# Altium PCB PMP41115.PcbDoc (part 3 of 6)
Units mm, origin at the board's own origin, x right, y up, seen from the top; angles counter-clockwise.
Board outline 102.92 x 46.74 mm, 4 copper layers (Top Layer, Signal Layer 1, Signal Layer 2, Bottom Layer), stack 1.016 mm thick; 174 components, 114 nets, 547 pads, 2622 vias.
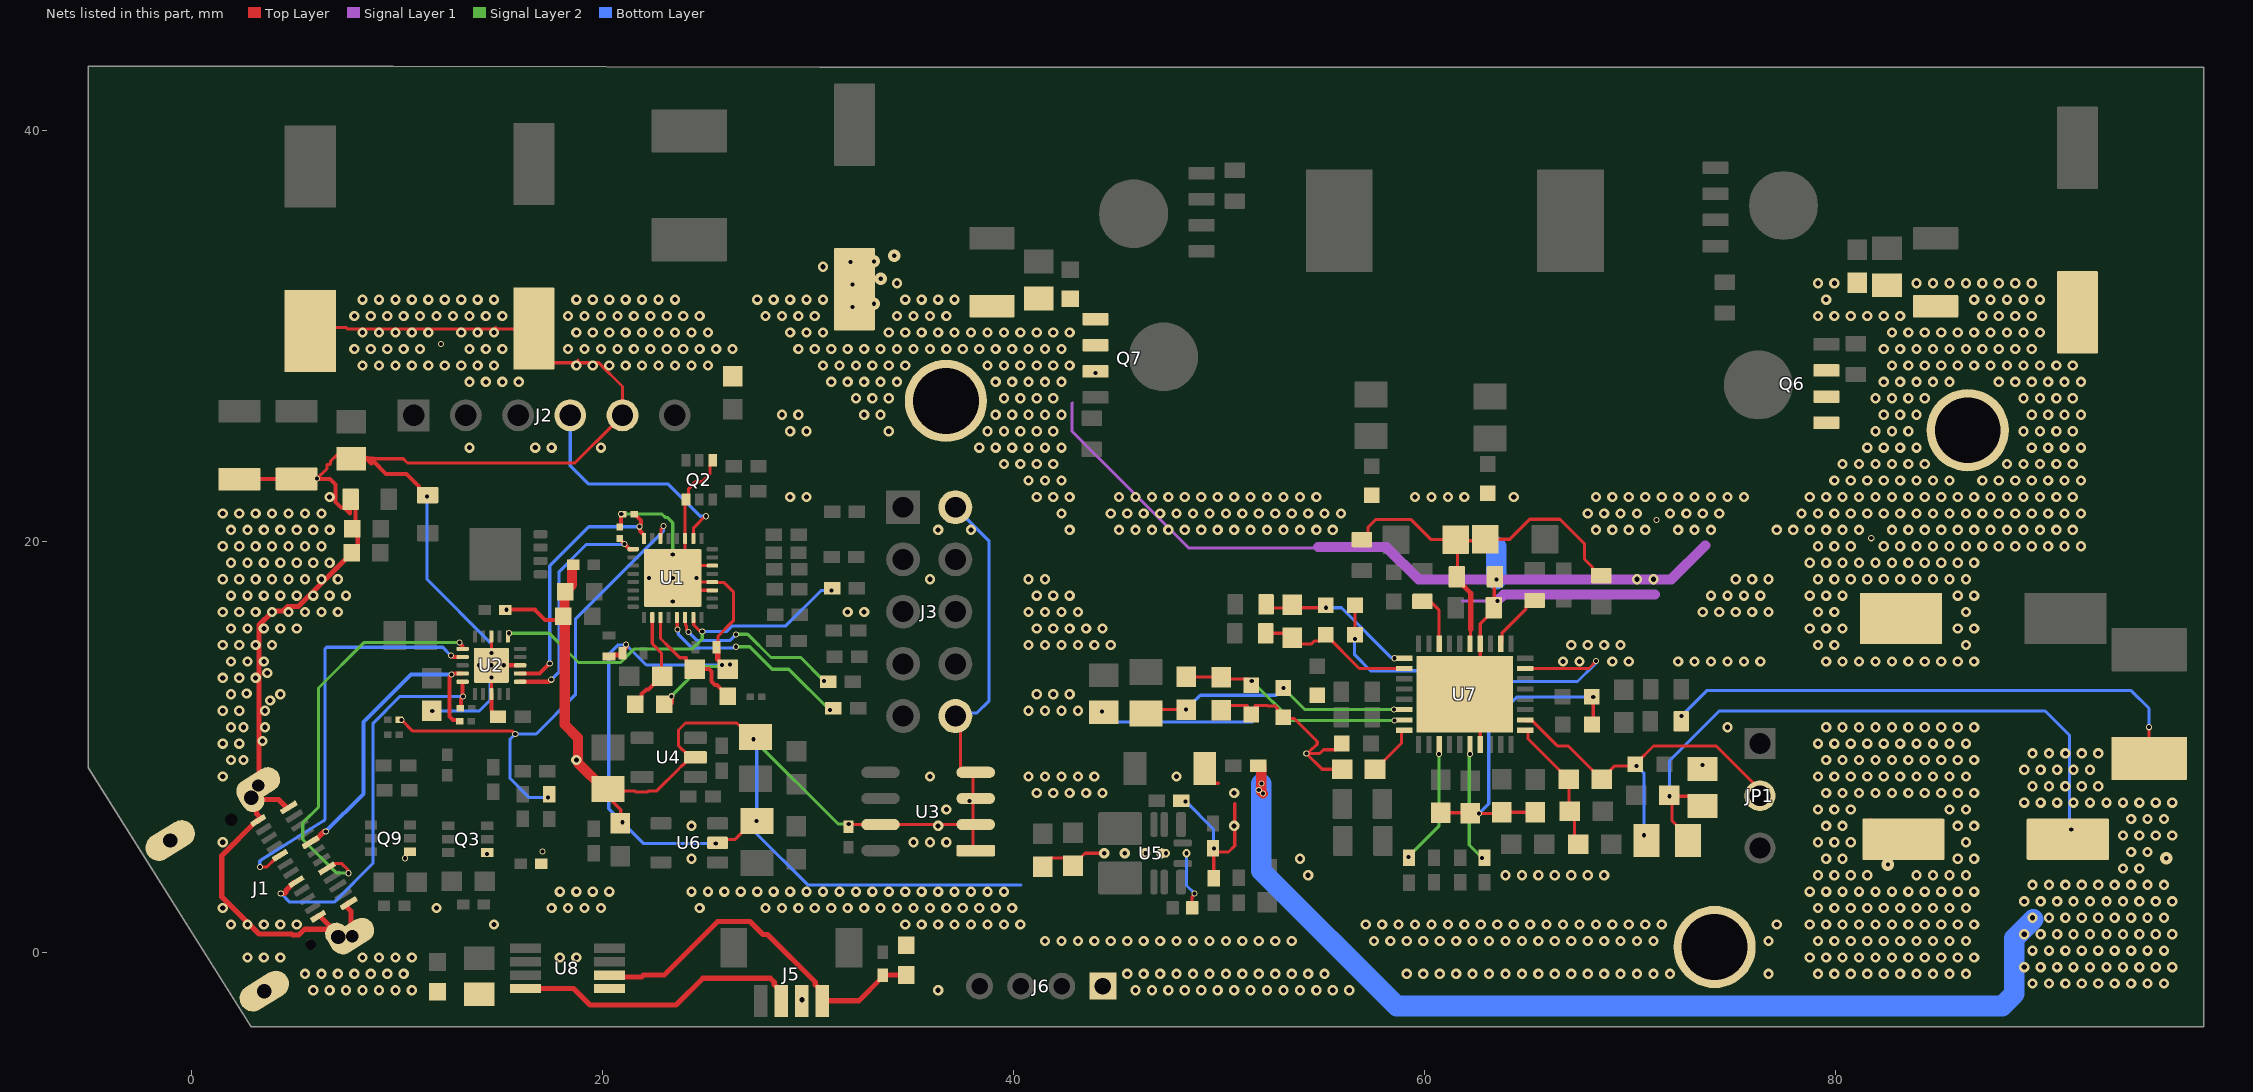
[diagram p4: the nets of this part, all layers, seen from the top]

## Part data (continued)
R12: library part CMP-0028069-1, "RES, 100 k, 1%, 0.05 W, 0201", Manufacturer="Yageo America", Power_W=50mW, Supplier Part Number 1=603-RC0201FS-7D100KL, TempCo="200 ppm/C", Tolerance_%=1%, Value2=0.05W, Value_Code=100k, AEC Category=Q200, AEC Grade=N/A, AEC Qualified=N, ComponentLink1Description="Datasheet link", ComponentLink1URL=http://www.yageo.com/documents/recent/PYu-RC_Group_51_RoHS_L_5.pdf, CompType=Resistor, EIA_Code=E96, LatestRevisionDate=2017-03-09, MountType=SMT, PackageReference=0201, PartNumber=RC0201FS-7D100KL, Published=2016-10-14, Publisher="Texas Instruments", Res_ohm=100k, RoHS=Y, SizeArea_mm2=0.18, SizeX_mm=0.6, SizeY_mm=0.3, SizeZ_mm=0.26, Supplier 1=Mouser, Technology="Thick Film", U/M=EA, Value1=1%, ValueDisplayed=100k, VDC_V=25V
R13 R16: library part CMP-0024263-1, "RES, 470, 0.1%, 0.1 W, 0603", Manufacturer="Yageo America", Power_W=100mW, TempCo="25 ppm/C", Tolerance_%=0.1%, Value2=0.1W, Value_Code=470R, ValueDisplayed=470, AEC Category=Q200, AEC Qualified=?, ComponentLink1Description="Datasheet link", ComponentLink1URL=http://www.yageo.com/pdf/PYu-RT_1-to-0.05_RoHS_L_3.pdf, CompType=Resistor, EIA_Code=E192, LatestRevisionDate=2017-03-09, MountType=SMT, PackageReference=0603, PartNumber=RT0603BRD07470RL, Published=2008-06-26, Publisher="Texas Instruments", Res_ohm=470, RoHS=Y, SizeArea_mm2=1.28, SizeX_mm=1.6, SizeY_mm=0.8, SizeZ_mm=1, Technology="Thin Film", U/M=EA, Value1=0.1%, VDC_V=75V
R14 R15 R62: library part CMP-0022735-5, "RES, 100 k, 1%, 0.1 W, 0603", Manufacturer=Yageo, Power_W=100mW, Supplier Part Number 1=311-100KHRCT-ND, TempCo="100 ppm/C", Tolerance_%=1%, Value2=0.1W, Value_Code=100k, AEC Category=Q200, AEC Grade=N/A, AEC Qualified=N, ComponentLink1Description="Datasheet link", ComponentLink1URL=http://www.yageo.com/pdf/Pu-RC0603_51_PbFree_L_2.pdf, CompType=Resistor, EIA_Code=E96, MountType=SMT, PackageReference=0603, PartNumber=RC0603FR-07100KL, Res_ohm=100k, RoHS=Y, SizeArea_mm2=1.28, SizeAreaWB_mm2=4.68, SizeX_mm=1.6, SizeY_mm=0.8, SizeZ_mm=1, Supplier 1=Digi-Key, Supplier 2=Mouser, Supplier 3=Farnell, Supplier Part Number 2=603-RC0603FR-07100KL, Supplier Part Number 3=9238727, Technology="Thick Film", Value1=1%, ValueDisplayed=100k, VDC_V=75V
R18 R20 R48 R60 R66 R98 R99 R100 R103 R104 R107 R109 R110: library part CMP-0027004-1, "RES, 0, 5%, 0.063 W, 0402", Manufacturer="Yageo America", Power_W=63mW, Supplier Part Number 1=311-0.0JRCT-ND, TempCo="200 ppm/C", Tolerance_%=5%, Value2=0.063W, Value_Code=0000, ValueDisplayed=0, AEC Category=Q200, AEC Qualified=?, ComponentLink1Description="Datasheet link", ComponentLink1URL=http://www.yageo.com/pdf/Pu-RC0402_51_PbFree_L_2.pdf, CompType=Resistor, EIA_Code=E24, LatestRevisionDate=2017-03-09, MountType=SMT, PackageReference=0402, PartNumber=RC0402JR-070RL, Published=2008-06-26, Publisher="Texas Instruments", Res_ohm=0, RoHS=Y, SizeArea_mm2=0.5, SizeX_mm=1, SizeY_mm=0.5, SizeZ_mm=0.6, Supplier 1=Digi-Key, Supplier 2=Mouser, Supplier 3=Farnell, Supplier Part Number 2=603-RC0402JR-070RL, Supplier Part Number 3=9232516, Technology="Thick Film", U/M=EA, Value1=5%, VDC_V=50V
R21 R25: library part CMP-0025885-5, "RES, 0, 5%, 0.1 W, 0603", Manufacturer=Yageo, Power_W=100mW, Supplier Part Number 1=311-0.0GRCT-ND, TempCo="200 ppm/C", Tolerance_%=5%, Value2=0.1W, Value_Code=0000, ValueDisplayed=0, AEC Category=Q200, AEC Grade=N/A, AEC Qualified=N, ComponentLink1Description="Datasheet link", ComponentLink1URL=http://www.yageo.com/pdf/Pu-RC0603_51_PbFree_L_2.pdf, CompType=Resistor, EIA_Code=E24, MountType=SMT, PackageReference=0603, PartNumber=RC0603JR-070RL, Res_ohm=0, RoHS=Y, SizeArea_mm2=1.28, SizeAreaWB_mm2=4.68, SizeX_mm=1.6, SizeY_mm=0.8, SizeZ_mm=1, Supplier 1=Digi-Key, Supplier 2=Mouser, Supplier 3=Farnell, Supplier Part Number 2=603-RC0603JR-070RL, Supplier Part Number 3=9233130, Technology="Thick Film", Value1=5%, VDC_V=75V
R22 R23 R26 R27: "RES, 0, 5%, 0.063 W, 0402", Manufacturer="Yageo America", PartNumber=RC0402JR-070RL, Power_W=63mW, Supplier Part Number 1=311-0.0JRCT-ND, TempCo="200 ppm/C", Tolerance_%=5%, Value2=0.063W, Value_Code=0000, ValueDisplayed=0, AEC Category=Q200, AEC Qualified=?, ComponentLink1Description="Datasheet link", ComponentLink1URL=http://www.yageo.com/pdf/Pu-RC0402_51_PbFree_L_2.pdf, CompType=Resistor, EIA_Code=E24, LatestRevisionDate=2017-03-09, MountType=SMT, PackageReference=0402, Published=2008-06-26, Publisher="Texas Instruments", Res_ohm=0, RoHS=Y, SizeArea_mm2=0.5, SizeX_mm=1, SizeY_mm=0.5, SizeZ_mm=0.6, Supplier 1=Digi-Key, Supplier 2=Mouser, Supplier 3=Farnell, Supplier Part Number 2=603-RC0402JR-070RL, Supplier Part Number 3=9232516, Technology="Thick Film", U/M=EA, Value1=5%, VDC_V=50V
R24: library part CMP-0024382-2, "RES, 60.4 k, 0.1%, 0.1 W, 0603", Manufacturer="Yageo America", Power_W=100mW, TempCo="25 ppm/C", Tolerance_%=0.1%, Value2=0.1W, Value_Code=60k4, ValueDisplayed=60.4k, AEC Category=Q200, AEC Qualified=?, ComponentLink1Description="Datasheet link", ComponentLink1URL=http://www.yageo.com/pdf/PYu-RT_1-to-0.05_RoHS_L_3.pdf, CompType=Resistor, EIA_Code=E192, LatestRevisionDate=2017-03-09, MountType=SMT, PackageReference=0603, PartNumber=RT0603BRD0760K4L, Published=2008-06-26, Publisher="Texas Instruments", Res_ohm=60.4k, RoHS=Y, SizeArea_mm2=1.28, SizeX_mm=1.6, SizeY_mm=0.8, SizeZ_mm=1, Technology="Thin Film", U/M=EA, Value1=0.1%, VDC_V=75V
R28: library part CMP-0026068-2, "RES, 19.6 k, 1%, 0.063 W, 0402", Manufacturer=Vishay-Dale, Power_W=63mW, Supplier Part Number 1=541-19.6KLCT-ND, TempCo="100 ppm/C", Tolerance_%=1%, Value2=0.063W, Value_Code=19k6, ValueDisplayed=19.6k, AEC Category=Q200, AEC Qualified=?, ComponentLink1Description="Datasheet link", ComponentLink1URL=http://www.vishay.com/docs/20035/dcrcwe3.pdf, CompType=Resistor, EIA_Code=E96, LatestRevisionDate=2017-03-09, MountType=SMT, PackageReference=0402, PartNumber=CRCW040219K6FKED, Published=2008-06-26, Publisher="Texas Instruments", Res_ohm=19.6k, RoHS=Y, SizeArea_mm2=0.5, SizeX_mm=1, SizeY_mm=0.5, SizeZ_mm=0.6, Supplier 1=Digi-Key, Supplier 2=Newark, Supplier 3=Mouser, Supplier Part Number 2=52K6774, Supplier Part Number 3=71-CRCW0402-19.6K-E3, Technology="Thick Film", U/M=EA, Value1=1%, VDC_V=50V
R29: library part CMP-0026658-1, "RES, 10.0 k, 1%, 0.1 W, 0402", Manufacturer=Panasonic, Power_W=100mW, Supplier Part Number 1=P10.0KLCT-ND, TempCo="100 ppm/C", Tolerance_%=1%, Value2=0.1W, Value_Code=10k0, ValueDisplayed=10.0k, AEC Category=Q200, AEC Qualified=?, ComponentLink1Description="Datasheet link", ComponentLink1URL=http://industrial.panasonic.com/www-data/pdf/AOA0000/AOA0000CE2.pdf, CompType=Resistor, EIA_Code=E96, LatestRevisionDate=2017-03-09, MountType=SMT, PackageReference=0402, PartNumber=ERJ-2RKF1002X, Published=2008-06-26, Publisher="Texas Instruments", Res_ohm=10k, RoHS=Y, SizeArea_mm2=0.5, SizeX_mm=1, SizeY_mm=0.5, SizeZ_mm=0.6, Supplier 1=Digi-Key, Supplier 2=Newark, Supplier 3=Mouser, Supplier Part Number 2=90W2949, Supplier Part Number 3=667-ERJ-2RKF1002X, Technology="Thick Film", U/M=EA, Value1=1%, VDC_V=50V
R30 R33: library part CMP-0096841-1, "Res Metal Strip 2512 0.005 Ohm 1% 1W 110ppm/C Molded SMD SMD Embossed Plastic T/R", Digikey Part Number=WSLG-.005CT-ND, Manufacturer=Vishay, Mouser Part Number=71-WSL25125L000FEA, Octopart Part Number=dd8716d1bbbb0240, Operating Temperature Range="-65°C to +170°C", Power_W=1W, TempCo=110ppm/°C, Tolerance_%=1%, AEC Grade="Grade 0", AEC Qualified=Yes, Category 5A00970A6D5C81C7=Uncategorized, Category 5C6A91606D4187Ad=Resistors, Category 7542B8484461Ae85="Passive Components", Category Cd01000Bfc2916C6="Single Components", ComponentLink1Description=Datasheet, ComponentLink1URL=https://www.vishay.com/docs/30100/wsl.pdf, Datasheet=https://www.vishay.com/docs/30100/wsl.pdf, Datasheet Path=datasheets/Res-WSL25125L000FEA.pdf, Digikey Description="RES 0.005 OHM 1% 1W 2512", HelpURL=https://upverter.com/upn/revision/4a960a7eb29c827a/, Lead Free=Yes, Mouser Description="Current Sense Resistors - SMD 1watt .005ohms 1%", PackageReference=2512, Part Number=WSL25125L000FEA, PartNumber=WSL25125L000FEA, Res_ohm=5m, RoHS=TRUE, Series=WSL, SizeZ_mm=0.889mm, Supplier 1=Digikey, Supplier 2=Mouser, Supplier Part Number 1=WSLG-.005CT-ND, Supplier Part Number 2=71-WSL25125L000FEA, Technology="Metal Element"
R31 R32 R35 R36: library part CMP-0093685-1, "RES Thick Film, 10Ω, 1%, 0.1W, 100ppm/°C, 0603", Approved Alternate Part Number=541-1.00HHCT-ND, Manufacturer=Vishay, Operating Temperature Range="-55°C to +155°C", Power=100mW, TempCo=100ppm/°C, Tolerance_%=1%, Voltage=75V, AEC Grade="Grade 0", AEC Qualified=Yes, ComponentLink1Description=Datasheet, ComponentLink1URL=http://www.vishay.com/docs/20035/dcrcwe3.pdf, Datasheet=http://www.vishay.com/docs/20035/dcrcwe3.pdf, Datasheet Path=datasheets/Res-CRCW060310R0FKEB.pdf, HelpURL=https://upverter.com/upn/revision/3a87135a4406d73b/, Lead Free=Yes, PackageReference=0603, Part Number=CRCW060310R0FKEB, PartNumber=CRCW060310R0FKEB, Power_W=100mW, Res_ohm=10, RoHS=TRUE, Series="D/CRCW e3", SizeZ_mm=0.5mm, Technology="Thick Film", VDC_V=75V
R34 R37 R43 R44 R49 R50 R53 R54 R55 R56: library part CMP-0093629-1, "Thick Film Resistors - SMD 1/10watt ZEROohm Jumper", Manufacturer=Vishay, Operating Temperature Range="-55°C to +155°C", Power=250mW, Power_W=330mW, TempCo=100ppm/°C, Tolerance_%=1%, AEC Grade="Grade 0", AEC Qualified=Yes, ComponentLink1Description=Datasheet, ComponentLink1URL=http://www.vishay.com/docs/20043/crcwhpe3.pdf, Datasheet=http://www.vishay.com/docs/20043/crcwhpe3.pdf, Datasheet Path=datasheets/Res-CRCW06031R50FKEAHP.pdf, HelpURL=https://upverter.com/upn/revision/04facc8566ca24c1/, Lead Free=Yes, PackageReference=0603, Part Number=CRCW06030000Z0EA, PartNumber=CRCW06030000Z0EA, Res_ohm=1.5, RoHS=TRUE, Series="CRCW-HP e3", SizeZ_mm=0.55mm, Technology="Thick Film", VDC_V=75V
R38: library part CMP-0023199-5, "RES, 5.23 k, 1%, 0.1 W, 0603", Manufacturer=Yageo, Power_W=100mW, Supplier Part Number 1=311-5.23KHRCT-ND, TempCo="100 ppm/C", Tolerance_%=1%, Value2=0.1W, Value_Code=5k23, ValueDisplayed=5.23k, AEC Category=Q200, AEC Grade=N/A, AEC Qualified=N, ComponentLink1Description="Datasheet link", ComponentLink1URL=http://www.yageo.com/pdf/Pu-RC0603_51_PbFree_L_2.pdf, CompType=Resistor, EIA_Code=E96, MountType=SMT, PackageReference=0603, PartNumber=RC0603FR-075K23L, Res_ohm=5.23k, RoHS=Y, SizeArea_mm2=1.28, SizeAreaWB_mm2=4.68, SizeX_mm=1.6, SizeY_mm=0.8, SizeZ_mm=1, Supplier 1=Digi-Key, Supplier 2=Mouser, Supplier 3=Farnell, Supplier Part Number 2=603-RC0603FR-075K23L, Supplier Part Number 3=9238573, Technology="Thick Film", Value1=1%, VDC_V=75V
R39: library part CMP-0022684-2, "RES, 10.0 k, 1%, 0.1 W, 0603", Manufacturer=Panasonic, Power_W=100mW, Supplier Part Number 1=P10.0KHCT-ND, TempCo="100 ppm/C", Tolerance_%=1%, Value2=0.1W, Value_Code=10k0, ValueDisplayed=10.0k, AEC Category=Q200, AEC Qualified=?, ComponentLink1Description="Datasheet link", ComponentLink1URL=http://industrial.panasonic.com/www-data/pdf/AOA0000/AOA0000CE2.pdf, CompType=Resistor, EIA_Code=E96, LatestRevisionDate=2017-03-09, MountType=SMT, PackageReference=0603, PartNumber=ERJ-3EKF1002V, Published=2008-06-26, Publisher="Texas Instruments", Res_ohm=10k, RoHS=Y, SizeArea_mm2=1.28, SizeX_mm=1.6, SizeY_mm=0.8, SizeZ_mm=1, Supplier 1=Digi-Key, Supplier 2=Newark, Supplier 3=Mouser, Supplier Part Number 2=64R5309, Supplier Part Number 3=667-ERJ-3EKF1002V, Technology="Thick Film", U/M=EA, Value1=1%, VDC_V=75V
R40: library part CMP-0023018-5, "RES, 30.1 k, 1%, 0.1 W, 0603", Manufacturer=Yageo, Power_W=100mW, Supplier Part Number 1=311-30.1KHRCT-ND, TempCo="100 ppm/C", Tolerance_%=1%, Value2=0.1W, Value_Code=30k1, ValueDisplayed=30.1k, AEC Category=Q200, AEC Grade=N/A, AEC Qualified=N, ComponentLink1Description="Datasheet link", ComponentLink1URL=http://www.yageo.com/pdf/Pu-RC0603_51_PbFree_L_2.pdf, CompType=Resistor, EIA_Code=E96, MountType=SMT, PackageReference=0603, PartNumber=RC0603FR-0730K1L, Res_ohm=30.1k, RoHS=Y, SizeArea_mm2=1.28, SizeAreaWB_mm2=4.68, SizeX_mm=1.6, SizeY_mm=0.8, SizeZ_mm=1, Supplier 1=Digi-Key, Supplier 2=Mouser, Supplier 3=Farnell, Supplier Part Number 2=603-RC0603FR-0730K1L, Supplier Part Number 3=1799339, Technology="Thick Film", Value1=1%, VDC_V=75V
R41 R42: library part CMP-0020812-2, "RES, 2.2, 5%, 0.125 W, 0805", Manufacturer="Yageo America", Power_W=125mW, Supplier Part Number 1=311-2.2ARCT-ND, TempCo="200 ppm/C", Tolerance_%=5%, Value2=0.125W, Value_Code=2R20, ValueDisplayed=2.2, AEC Category=Q200, AEC Qualified=?, ComponentLink1Description="Datasheet link", ComponentLink1URL=http://www.yageo.com/pdf/Pu-RC0805_51_PbFree_L_2.pdf, CompType=Resistor, EIA_Code=E24, LatestRevisionDate=2017-03-09, MountType=SMT, PackageReference=0805, PartNumber=RC0805JR-072R2L, Published=2008-06-26, Publisher="Texas Instruments", Res_ohm=2.2, RoHS=Y, SizeArea_mm2=2.5, SizeX_mm=2, SizeY_mm=1.25, SizeZ_mm=1.45, Supplier 1=Digi-Key, Supplier 2=Mouser, Supplier 3=Farnell, Supplier Part Number 2=603-RC0805JR-072R2L, Supplier Part Number 3=1799490, Technology="Thick Film", U/M=EA, Value1=5%, VDC_V=150V
R45: library part CMP-0021522-3, "Thick Film Resistors - SMD 1/8Watt 1Mohms 1% Commercial Use", Manufacturer="Vishay / Dale", Power_W=125mW, Supplier Part Number 1=P1.00MCCT-ND, TempCo="100 ppm/C", Tolerance_%=1%, Value2=0.125W, Value_Code=1M00, ValueDisplayed=1.00M, AEC Category=Q200, AEC Grade=0, AEC Qualified=Y, ComponentLink1Description="Datasheet link", ComponentLink1URL=https://industrial.panasonic.com/cdbs/www-data/pdf/RDA0000/AOA0000C304.pdf, CompType=Resistor, EIA_Code=E96, MountType=SMT, PackageReference=0805, PartNumber=CRCW08051M00FKEAC, Res_ohm=1M, RoHS=Y, SizeArea_mm2=2.5, SizeAreaWB_mm2=6.75, SizeX_mm=2, SizeY_mm=1.25, SizeZ_mm=1.45, Supplier 1=Digi-Key, Supplier 2=Mouser, Supplier 3=Farnell, Supplier Part Number 2=667-ERJ-6ENF1004V, Supplier Part Number 3=1748405, Technology="Thick Film", Value1=1%
R46: library part CMP-0024170-1, "RES, 383 k, 0.1%, 0.1 W, 0603", Manufacturer="Yageo America", Power_W=100mW, TempCo="25 ppm/C", Tolerance_%=0.1%, Value2=0.1W, Value_Code=383k, AEC Category=Q200, AEC Qualified=?, ComponentLink1Description="Datasheet link", ComponentLink1URL=http://www.yageo.com/pdf/PYu-RT_1-to-0.05_RoHS_L_3.pdf, CompType=Resistor, EIA_Code=E192, LatestRevisionDate=2017-03-09, MountType=SMT, PackageReference=0603, PartNumber=RT0603BRD07383KL, Published=2008-06-26, Publisher="Texas Instruments", Res_ohm=383k, RoHS=Y, SizeArea_mm2=1.28, SizeX_mm=1.6, SizeY_mm=0.8, SizeZ_mm=1, Technology="Thin Film", U/M=EA, Value1=0.1%, ValueDisplayed=383k, VDC_V=75V
R47: library part CMP-0024106-3, "RES, 31.2 k, 0.1%, 0.1 W, 0603", Manufacturer="Yageo America", Power_W=100mW, TempCo="25 ppm/C", Tolerance_%=0.1%, Value2=0.1W, Value_Code=31k2, ValueDisplayed=31.2k, AEC Category=Q200, AEC Qualified=?, ComponentLink1Description="Datasheet link", ComponentLink1URL=http://www.yageo.com/pdf/PYu-RT_1-to-0.05_RoHS_L_3.pdf, CompType=Resistor, EIA_Code=E192, LatestRevisionDate=2017-03-09, MountType=SMT, PackageReference=0603, PartNumber=RT0603BRD0731K2L, Published=2008-06-26, Publisher="Texas Instruments", Res_ohm=31.2k, RoHS=Y, SizeArea_mm2=1.28, SizeX_mm=1.6, SizeY_mm=0.8, SizeZ_mm=1, Technology="Thin Film", U/M=EA, Value1=0.1%, VDC_V=75V
R51: library part CMP-0025744-3, "RES, 1.1, 5%, 0.1 W, 0603", Manufacturer=Vishay-Dale, Power_W=100mW, Supplier Part Number 1=541-1.1GCT-ND, TempCo="200 ppm/C", Tolerance_%=5%, Value2=0.1W, Value_Code=1R10, ValueDisplayed=1.1, AEC Category=Q200, AEC Qualified=?, ComponentLink1Description="Datasheet link", ComponentLink1URL=http://www.vishay.com/docs/20035/dcrcwe3.pdf, CompType=Resistor, EIA_Code=E24, LatestRevisionDate=2017-03-09, MountType=SMT, PackageReference=0603, PartNumber=CRCW06031R10JNEA, Published=2008-06-26, Publisher="Texas Instruments", Res_ohm=1.1, RoHS=Y, SizeArea_mm2=1.28, SizeX_mm=1.6, SizeY_mm=0.8, SizeZ_mm=1, Supplier 1=Digi-Key, Supplier 2=Mouser, Supplier Part Number 2=71-CRCW0603J-1.1-E3, Technology="Thick Film", U/M=EA, Value1=5%, VDC_V=75V
R52: library part CMP-0018933-2, "Thick Film Resistors - SMD 0805 Anti-Surge Res. 0.1%, 249Kohm", Manufacturer=Panasonic, Power_W=125mW, Supplier Part Number 1=RG20P249KBCT-ND, TempCo="25 ppm/C", Tolerance_%=0.1%, Value2=0.125W, Value_Code=249k, AEC Category=Q200, AEC Qualified=?, ComponentLink1Description="Datasheet link", ComponentLink1URL=http://www.susumu.co.jp/english/pdf/products-j01-01.pdf, CompType=Resistor, EIA_Code=E192, LatestRevisionDate=2017-03-09, MountType=SMT, PackageReference=0805, PartNumber=ERJ-PB6B2493V, Published=2008-06-26, Publisher="Texas Instruments", Res_ohm=249k, RoHS=Y, SizeArea_mm2=2.5, SizeX_mm=2, SizeY_mm=1.25, SizeZ_mm=1.45, Supplier 1=Digi-Key, Supplier 2=Mouser, Supplier Part Number 2=754-RG2012P-2493-BT5, Technology="Thin Film", U/M=EA, Value1=0.1%, ValueDisplayed=249k, VDC_V=100V
R57: library part CMP-0023733-2, "RES, 13.7 k, 0.1%, 0.1 W, 0603", Manufacturer="Yageo America", Power_W=100mW, TempCo="25 ppm/C", Tolerance_%=0.1%, Value2=0.1W, Value_Code=13k7, ValueDisplayed=13.7k, AEC Category=Q200, AEC Qualified=?, ComponentLink1Description="Datasheet link", ComponentLink1URL=http://www.yageo.com/pdf/PYu-RT_1-to-0.05_RoHS_L_3.pdf, CompType=Resistor, EIA_Code=E192, LatestRevisionDate=2017-03-09, MountType=SMT, PackageReference=0603, PartNumber=RT0603BRD0713K7L, Published=2008-06-26, Publisher="Texas Instruments", Res_ohm=13.7k, RoHS=Y, SizeArea_mm2=1.28, SizeX_mm=1.6, SizeY_mm=0.8, SizeZ_mm=1, Technology="Thin Film", U/M=EA, Value1=0.1%, VDC_V=75V
R58: library part CMP-0024097-2, "RES, 30.5 k, 0.1%, 0.1 W, 0603", Manufacturer="Yageo America", Power_W=100mW, TempCo="25 ppm/C", Tolerance_%=0.1%, Value2=0.1W, Value_Code=30k5, ValueDisplayed=30.5k, AEC Category=Q200, AEC Qualified=?, ComponentLink1Description="Datasheet link", ComponentLink1URL=http://www.yageo.com/pdf/PYu-RT_1-to-0.05_RoHS_L_3.pdf, CompType=Resistor, EIA_Code=E192, LatestRevisionDate=2017-03-09, MountType=SMT, PackageReference=0603, PartNumber=RT0603BRD0730K5L, Published=2008-06-26, Publisher="Texas Instruments", Res_ohm=30.5k, RoHS=Y, SizeArea_mm2=1.28, SizeX_mm=1.6, SizeY_mm=0.8, SizeZ_mm=1, Technology="Thin Film", U/M=EA, Value1=0.1%, VDC_V=75V
R59: library part CMP-0023735-1, "RES, 13.0 k, 0.1%, 0.1 W, 0603", Manufacturer="Yageo America", Power_W=100mW, TempCo="25 ppm/C", Tolerance_%=0.1%, Value2=0.1W, Value_Code=13k0, ValueDisplayed=13.0k, AEC Category=Q200, AEC Qualified=?, ComponentLink1Description="Datasheet link", ComponentLink1URL=http://www.yageo.com/pdf/PYu-RT_1-to-0.05_RoHS_L_3.pdf, CompType=Resistor, EIA_Code=E192, LatestRevisionDate=2017-03-09, MountType=SMT, PackageReference=0603, PartNumber=RT0603BRD0713KL, Published=2008-06-26, Publisher="Texas Instruments", Res_ohm=13k, RoHS=Y, SizeArea_mm2=1.28, SizeX_mm=1.6, SizeY_mm=0.8, SizeZ_mm=1, Technology="Thin Film", U/M=EA, Value1=0.1%, VDC_V=75V
R63 R64: library part CMP-0092857-1, "Thick Film Resistors - SMD 1/8watt ZEROohm Jumper", Manufacturer=Vishay, Operating Temperature Range="-55°C to +155°C", Power_W=500mW, TempCo=200ppm/°C, Tolerance_%=5%, AEC Grade="Grade 0", AEC Qualified=Yes, ComponentLink1Description=Datasheet, ComponentLink1URL=https://www.vishay.com/docs/20043/crcwhpe3.pdf, Datasheet=https://www.vishay.com/docs/20043/crcwhpe3.pdf, Datasheet Path=datasheets/Res-CRCW080510R0JNEAHP.pdf, HelpURL=https://upverter.com/upn/revision/5f84fa7f25e15205/, Lead Free=Yes, PackageReference=0805, Part Number=CRCW08050000Z0EA, PartNumber=CRCW08050000Z0EA, Res_ohm=0, RoHS=TRUE, Series="CRCW-HP e3", SizeZ_mm=0.6mm, Technology="Thick Film", VDC_V=150V
R65: library part CMP-0023086-5, "RES, 3.60 k, 1%, 0.1 W, 0603", Manufacturer=Yageo, Power_W=100mW, Supplier Part Number 1=311-3.60KHRCT-ND, TempCo="100 ppm/C", Tolerance_%=1%, Value2=0.1W, Value_Code=3k60, ValueDisplayed=3.60k, AEC Category=Q200, AEC Grade=N/A, AEC Qualified=N, ComponentLink1Description="Datasheet link", ComponentLink1URL=http://www.yageo.com/pdf/Pu-RC0603_51_PbFree_L_2.pdf, CompType=Resistor, MountType=SMT, PackageReference=0603, PartNumber=RC0603FR-073K6L, Res_ohm=3.6k, RoHS=Y, SizeArea_mm2=1.28, SizeAreaWB_mm2=4.68, SizeX_mm=1.6, SizeY_mm=0.8, SizeZ_mm=1, Supplier 1=Digi-Key, Supplier 2=Mouser, Supplier 3=Farnell, Supplier Part Number 2=603-RC0603FR-073K6L, Supplier Part Number 3=1799338, Technology="Thick Film", Value1=1%, VDC_V=75V
R67 R68 R69 R70: library part CMP-0078781-1, "RES, 10.5 k, 1%, 0.063 W, 0402", Manufacturer="Yageo America", Power_W=63mW, Supplier Part Number 1=YAG2951CT-ND, TempCo="100 ppm/C", Tolerance_%=1%, Value2=0.063W, Value_Code=10k5, ValueDisplayed=10.5k, AEC Category=Q200, AEC Grade=N/A, AEC Qualified=N, ComponentLink1Description="Datasheet link", ComponentLink1URL=http://www.yageo.com/documents/recent/PYu-RC_Group_51_RoHS_L_8.pdf, CompType=Resistor, EIA_Code=E96, MountType=SMT, PackageReference=0402, PartNumber=RC0402FR-0710K5L, Res_ohm=10.5k, RoHS=Y, SizeArea_mm2=0.5, SizeX_mm=1, SizeY_mm=0.5, SizeZ_mm=0.6, Supplier 1=Digi-Key, Supplier 2=Newark, Supplier 3=Mouser, Supplier Part Number 2=66R1118, Supplier Part Number 3=603-RC0402FR-0710K5L, Technology="Thick Film", Value1=1%, VDC_V=50V
R71: library part CMP-0023607-3, "RES, 8.20 k, 0.1%, 0.1 W, 0603", Manufacturer="Susumu Co Ltd", Power_W=100mW, Supplier Part Number 1=RG16P8.2KBCT-ND, TempCo="25 ppm/C", Tolerance_%=0.1%, Value2=0.1W, Value_Code=8k20, ValueDisplayed=8.20k, AEC Category=Q200, AEC Qualified=?, ComponentLink1Description="Datasheet link", ComponentLink1URL=http://www.susumu.co.jp/english/pdf/products-j01-01.pdf, CompType=Resistor, LatestRevisionDate=2017-03-09, MountType=SMT, PackageReference=0603, PartNumber=RG1608P-822-B-T5, Published=2008-06-26, Publisher="Texas Instruments", Res_ohm=8.2k, RoHS=Y, SizeArea_mm2=1.28, SizeX_mm=1.6, SizeY_mm=0.8, SizeZ_mm=1, Supplier 1=Digi-Key, Supplier 2=Mouser, Supplier Part Number 2=754-RG1608P-822-BT5, Technology="Metal Film", U/M=EA, Value1=0.1%, VDC_V=75V
R97 R108: library part CMP-0026745-1, "RES, 100 k, 1%, 0.063 W, 0402", Manufacturer="Samsung Electro-Mechanics", Power_W=63mW, Supplier Part Number 1=1276-3432-1-ND, TempCo="100 ppm/C", Tolerance_%=1%, Value2=0.063W, Value_Code=100k, AEC Category=Q200, AEC Grade=N/A, AEC Qualified=N, ComponentLink1Description="Datasheet link", ComponentLink1URL=http://www.samsungsem.com/global/support/library/product-catalog/__icsFiles/afieldfile/2015/01/12/CHIP_RESISTOR_150112_1.pdf, CompType=Resistor, EIA_Code=E96, LatestRevisionDate=2017-03-09, MountType=SMT, PackageReference=0402, PartNumber=RC1005F104CS, Published=2008-06-26, Publisher="Texas Instruments", Res_ohm=100k, RoHS=Y, SizeArea_mm2=0.5, SizeX_mm=1, SizeY_mm=0.5, SizeZ_mm=0.6, Supplier 1=Digi-Key, Technology="Thick Film", U/M=EA, Value1=1%, ValueDisplayed=100k, VDC_V=80V
R101 R102: library part CMP-0023490-1, "RES, 249 k, 0.1%, 0.1 W, 0603", Manufacturer="Susumu Co Ltd", Power_W=100mW, Supplier Part Number 1=RG16P249KBCT-ND, TempCo="25 ppm/C", Tolerance_%=0.1%, Value2=0.1W, Value_Code=249k, AEC Category=Q200, AEC Qualified=?, ComponentLink1Description="Datasheet link", ComponentLink1URL=http://www.susumu.co.jp/english/pdf/products-j01-01.pdf, CompType=Resistor, EIA_Code=E192, LatestRevisionDate=2017-03-09, MountType=SMT, PackageReference=0603, PartNumber=RG1608P-2493-B-T5, Published=2008-06-26, Publisher="Texas Instruments", Res_ohm=249k, RoHS=Y, SizeArea_mm2=1.28, SizeX_mm=1.6, SizeY_mm=0.8, SizeZ_mm=1, Supplier 1=Digi-Key, Supplier 2=Mouser, Supplier 3=Farnell, Supplier Part Number 2=754-RG1608P-2493-BT5, Supplier Part Number 3=9366245, Technology="Metal Film", U/M=EA, Value1=0.1%, ValueDisplayed=249k, VDC_V=75V
R105 R106: library part CMP-0026660-1, "RES, 1.00 M, 1%, 0.1 W, 0402", Manufacturer=Panasonic, Power_W=100mW, Supplier Part Number 1=P1.00MLCT-ND, TempCo="100 ppm/C", Tolerance_%=1%, Value2=0.1W, Value_Code=1M00, ValueDisplayed=1.00M, AEC Category=Q200, AEC Qualified=?, ComponentLink1Description="Datasheet link", ComponentLink1URL=http://industrial.panasonic.com/www-data/pdf/AOA0000/AOA0000CE2.pdf, CompType=Resistor, EIA_Code=E96, LatestRevisionDate=2017-03-09, MountType=SMT, PackageReference=0402, PartNumber=ERJ-2RKF1004X, Published=2008-06-26, Publisher="Texas Instruments", Res_ohm=1M, RoHS=Y, SizeArea_mm2=0.5, SizeX_mm=1, SizeY_mm=0.5, SizeZ_mm=0.6, Supplier 1=Digi-Key, Supplier 2=Newark, Supplier 3=Mouser, Supplier Part Number 2=64R5250, Supplier Part Number 3=667-ERJ-2RKF1004X, Technology="Thick Film", U/M=EA, Value1=1%, VDC_V=50V
R111: library part CRCW040210K0DHEDP, "D10/CRCW0402-P 50 10K 0.5% ET7 e3", Manufacturer_Name=Vishay, Copyright="Copyright (C) 2026 Ultra Librarian. All rights reserved.", Manufacturer_Part_Number=CRCW040210K0DHEDP
U1: library part CMP-0121143-2, "USB Type-C® and USB PD Controller with Integrated Power Switches Optimized for Power Applications", Manufacturer="Texas Instruments", Max Supply Voltage=22V, Min Supply Voltage=3V, Nominal Supply Current=1-3mA, Operating Temperature Range="-40°C to +125°C", AEC Category=Q200, AEC Qualified=No, ComponentLink1Description="Datasheet Link", ComponentLink1URL=http://www.ti.com/lit/ds/symlink/GPN.pdf, ComponentLink2Description="Product Folder", ComponentLink2URL=http://www.ti.com/product/GPN, ComponentLink3Description="Online Datasheet", ComponentLink3URL=http://www.ti.com/product/GPN/datasheet, CompType=IC, Datasheet Path=datasheets/IC-TPS26750RSMR.pdf, HelpURL=https://upverter.com/upn/revision/6ed298974f27b866/, Interface=I2C,USB, Lead Free=Yes, Number Of Ports=1, PackageReference=VQFN32, Part Number=TPS26750RSMR, PartNumber=TPS26750RSMR, RoHS=TRUE, SizeZ_mm=1mm, Standoff Height=0mm, TaMax_C=+85°C, TaMin_C=-40°C, TJmax_C=+125°C, Usb Standard="USB 3.1"
U2: library part CMP-0034161-1, "USB Type-C® 48V EPR Port Protector: Short-to-VBUS Overvoltage and IEC ESD Protection", Manufacturer="Texas Instruments", Operating Supply Voltage=3.3V, Operating Temperature Range="-40°C to +125°C", AEC Qualified=No, Datasheet Path=datasheets/IC-TPD4S480RUKR.pdf, Direction=Bidirectional, HelpURL=https://upverter.com/upn/revision/f85af9e28ce4aa72/, Interface=USB, Number Of Channels=4, PackageReference=WQFN20, Part Number=TPD4S480RUKR, PartNumber=TPD4S480RUKR, RoHS=UNKNOWN, SizeZ_mm=0.8mm, Standoff Height=0mm, TJmax_C=+125°C
U3: library part CMP-0091847-1, "EEPROM Memory IC 512Kb (64K x 8) I²C 1MHz 900ns 8-SOIC", Digikey Part Number=CAT24C512WI-GT3OSCT-ND, Frequency_Fixed=1MHz, Manufacturer="ON Semi", Max Supply Voltage=5.5V, Min Supply Voltage=1.8V, Mouser Part Number=863-CAT24C512WI-GT3, Operating Temperature Range="-40°C to +85°C", AEC Qualified=No, ComponentLink1Description=Datasheet, ComponentLink1URL=https://www.onsemi.com/pub/Collateral/CAT24C512-D.PDF, Datasheet=https://www.onsemi.com/pub/Collateral/CAT24C512-D.PDF, Datasheet Path=datasheets/IC-CAT24C512WI-GT3.pdf, Digikey Description="IC EEPROM 512K I2C 1MHZ 8SOIC", HelpURL=https://upverter.com/upn/revision/5288ffb50134fafc/, Interface=I2C, Lead Free=Yes, Memory Size=512Kbits, Memory Type=EEPROM, Mouser Description="EEPROM 512KB I2C SER EEPROM", PackageReference=SOIC8, Part Number=CAT24C512WI-GT3, PartNumber=CAT24C512WI-GT3, RoHS=TRUE, SizeZ_mm=1.75mm, Standoff Height=0.1mm, Supplier 1=Digikey, Supplier 2=Mouser, Supplier Part Number 1=CAT24C512WI-GT3OSCT-ND, Supplier Part Number 2=863-CAT24C512WI-GT3
U4: library part CMP-0096923-1, "Linear Voltage Regulator IC  1 Output  200mA SOT-23-5", Digikey Part Number=296-TPS7A2450DBVRCT-ND, Dropout Voltage=160mV, Manufacturer="Texas Instruments", Max Supply Voltage=18V, Min Supply Voltage=2.4V, Mouser Part Number=595-TPS7A2450DBVR, Nominal Supply Current=2-15uA, Operating Temperature Range="-40°C to +125°C", Output Voltage=5V, Accuracy Percentage=2%, AEC Qualified=No, ComponentLink1Description=Datasheet, ComponentLink1URL=https://www.ti.com/lit/ds/symlink/tps7a24.pdf?ts=1612198841338&ref_url=https%253A%252F%252Fwww.ti.com%252Fproduct%252FTPS7A24%253FkeyMatch%253DTPS7A2450DBVR%2526tisearch%253DSearch-EN-everything%2526usecase%253DOPN, Datasheet=https://www.ti.com/lit/ds/symlink/tps7a24.pdf?ts=1612198841338&ref_url=https%253A%252F%252Fwww.ti.com%252Fproduct%252FTPS7A24%253FkeyMatch%253DTPS7A2450DBVR%2526tisearch%253DSearch-EN-everything%2526usecase%253DOPN, Datasheet Path=datasheets/IC-TPS7A2450DBVR.pdf, Digikey Description="IC REG LINEAR 5V 200MA SOT23-5", HelpURL=https://upverter.com/upn/revision/aa9411556fc6a2cf/, Lead Free=Yes, Mouser Description="200-mA, 18-V, ultra-low-IQ, low-dropout (LDO) voltage regulator with enable 5-SOT-23 -40 to 125", Number Of Outputs=1, Output Type=Fixed, PackageReference=SOT23-5, Part Number=TPS7A2450DBVR, PartNumber=TPS7A2450DBVR, RoHS=TRUE, SizeZ_mm=1.45mm, Standoff Height=0mm, TJmax_C=+125°C
U5: library part CMP-0096774-1, "3 V to 65 V Input, 1 V to 13 V Output, 600-mA Synchronous Buck Converter Power Module in a HotRod™ QFN Package", Manufacturer="Texas Instruments", Max Supply Voltage=65V, Min Supply Voltage=3.6V, Nominal Supply Current=17-18uA, Operating Temperature Range="-40°C to +125°C", Output Voltage=1-13V, Switching Frequency=200-2200kHz, AEC Qualified=No, Datasheet Path=datasheets/IC-TPSM365R6RDNR.pdf, HelpURL=https://upverter.com/upn/revision/f14bde8c92c41f4a/, Max Duty Cycle=98%, Number Of Outputs=1, Output Type=AdjustableProgrammable, PackageReference=QFN-FCMOD11, Part Number=TPSM365R6RDNR, PartNumber=TPSM365R6RDNR, RoHS=UNKNOWN, SizeZ_mm=2.1mm, Standoff Height=0mm, Switching Topology=Buck, TJmax_C=+125°C
U6: library part CMP-0035539-1, "Single Output LDO, 150 mA, Fixed 3.3 V Output, 2.7 to 10 V Input, with Low IQ, 5-pin SOT-23 (DBV), -40 to 125 degC, Green (RoHS & no Sb/Br)", Manufacturer="Texas Instruments", Accuracy(%)=3, Code_JEDEC=MO-178, ComponentLink1Description="Manufacturer URL", ComponentLink1URL=http://www.ti.com/, ComponentLink2Description=Datasheet, ComponentLink2URL=http://www.ti.com/general/docs/lit/getliterature.tsp?genericPartNumber=TPS76333&fileType=pdf, ComponentLink3Description="Package Specification", ComponentLink3URL=http://www.ti.com/litv/pdf/mpds018i, DatasheetVersion=SLVS181H, Eco-Plan="Green (RoHS & no Sb/Br)", Fixed Output Options(V)=3.3, Iout(Max)(A)=0.15, Iq(Typ)(mA)=0.08, Mounting Technology="Surface Mount", PackageDescription="5-Pin Plastic Small Outline, Body 1.60 Ãƒâ€” 2.90 mm, Pitch 0.95 mm", PackageReference=DBV0005A, PackageVersion=4073253-4/K, PartNumber=TPS76333DBVR, SubFamily="Single Channel LDO", Vdo(Typ)(mV)=300, Vin(Max)(V)=10, Vin(Min)(V)=2.7, Vout Adj(Max)(V)=3.3, Vout Adj(Min)(V)=3.3
U7: "Stand-alone or I&sup2;C-controlled 70-V bidirectional buck-boost charge controller with MPPT 36-VQFN -40 to 125", Manufacturer_Name="Texas Instruments", Copyright="Copyright (C) 2025 Ultra Librarian. All rights reserved.", Manufacturer_Part_Number=BQ25756RRVR, RefDes=RefDes, Type=Interface
U8: "Description", Manufacturer_Name=Microchip, Copyright="Copyright (C) 2025 Ultra Librarian. All rights reserved.", Manufacturer_Part_Number=EMC2101-R-ACZL-TR, RefDes=RefDes, Type=Type

## Free pads (board coordinates)
  round 4 hole 3.2: 2(36.723,26.845) 2(86.431,25.423) 4(74.117,0.279)

## Via types
v1: diameter 0.5, hole 0.25, Top Layer to Bottom Layer, 2320 vias
v2: diameter 0.3, hole 0.2, Top Layer to Bottom Layer, tented both sides, 198 vias
v3: diameter 0.5, hole 0.25, Top Layer to Bottom Layer, tented both sides, 61 vias
v4: diameter 0.5, hole 0.2, Top Layer to Bottom Layer, tented both sides, 19 vias
v5: diameter 0.61, hole 0.203, Top Layer to Bottom Layer, tented both sides, 13 vias
v6: diameter 0.5, hole 0.2, Top Layer to Bottom Layer, 6 vias
v7: diameter 0.4, hole 0.2, Top Layer to Bottom Layer, tented both sides, 3 vias
v8: diameter 0.35, hole 0.2, Top Layer to Bottom Layer, tented both sides, 2 vias

## Nets (pads, with @x,y where several pads share a name; then routed paths per layer and width w, separated by ;. In a path a pad name is that pad's centre, name@x,y a point inside that pad or via, vN(x,y) a via of type N, cw(c..) or ccw(c..) an arc to the next point about the centre after c; other vN are vias at no path point)
/INT: R68.1 U7.3 | length 6.1
  Top Layer w0.152: v2@60.706,9.703 60.712,9.709 60.712,10.172 U7.3@60.718,10.178
  Signal Layer 2 w0.152: v2(59.222,4.665) 60.706,6.149 v2(60.706,9.677)
/PG: R67.1 U7.6 | length 5.7
  Top Layer w0.152: U7.6@62.218,10.178 62.216,10.176 62.216,9.691 v2@62.23,9.677
  Signal Layer 2 w0.152: v2@62.179,9.576 62.179,5.239 v2(62.804,4.615)
  other v2: 62.214,9.677
ACN: C29.2 C33.1 R32.1 U7.29 | length 8.4
  Top Layer w0.152: R32.1@52.298,16.944 52.478,16.764 53.416,16.764 C29.2@53.581,16.929 ; v2(55.209,16.781) 55.2,16.781 C29.2@53.729,16.781 ; v2(58.547,14.326) v2(58.547,14.326) 59.067,14.327 U7.29@59.068,14.328 ; C29.2@53.581,16.929 C29.2@53.729,16.781 ; C29.2@53.581,16.929 C29.2@53.729,16.781 ; C29.2@53.581,16.929 C29.2@53.729,16.781
  Bottom Layer w0.152: v2(55.209,16.781) 55.964,16.781 58.392,14.354 58.519,14.354 v2(58.547,14.326)
ACOV: C39.1 R46.1 R47.2 U7.35 | length 11.7
  Top Layer w0.152: R46.1@48.421,13.42 50.112,13.42 R47.2@50.112,13.395 ; R47.2@50.165,13.437 50.281,13.32 51.435,13.32 51.571,13.184 C39.1@51.571,13.016 ; v2(58.547,11.303) 58.559,11.315 58.89,11.315 U7.35@58.903,11.303
  Top Layer w0.254: C39.1@51.571,13.016 51.571,13.193 v2(51.598,13.221)
  Signal Layer 2 w0.152: v2(51.598,13.221) 53.516,11.303 v2(58.547,11.303)
ACP: C29.1 C32.1 R31.1 U7.30 | length 7.9
  Top Layer w0.152: R31.1@52.277,15.539 53.472,15.539 53.632,15.38 53.632,15.253 53.861,15.024 54.512,15.024 54.65,15.162 54.893,15.162 C32.1@55.198,15.467 56.837,13.828 U7.30@59.068,13.828
ACUV: C38.1 R45.1 R46.2 U7.34 | length 13.3
  Top Layer w0.152: R45.1@46.452,11.629 46.659,11.836 R46.2@48.336,11.836 ; v2(58.522,11.836) 58.526,11.832 58.848,11.832 U7.34@58.877,11.862
  Signal Layer 2 w0.152: v2(53.138,12.88) 54.181,11.836 v2(58.522,11.836)
  Bottom Layer w0.152: v2(48.402,11.828) 49.103,12.529 52.788,12.529 v2(53.138,12.88)
ADCIN1: R13.1 R15.2 U1.2 | length 5
  Top Layer w0.152: U1.2@22.435,16.307 22.435,15.041 22.478,14.998 22.478,14.987 22.888,14.577 R13.1@22.888,13.448
  Top Layer w0.2: R15.2@21.616,12.099 21.916,12.399 21.916,12.578 22.151,12.813 22.253,12.813 22.888,13.448 R13.1@22.913,13.448
ADCIN2: R14.1 R16.2 U1.3 | length 5.8
  Top Layer w0.152: U1.3@22.835,16.307 22.835,15.29 23.304,14.821 23.312,14.821 23.782,14.352 24.089,14.352 24.089,14.276 ; R16.2@24.089,14.275 24.089,14.199 24.488,13.801 R16.2@24.513,13.801
  Top Layer w0.2: R16.2@24.513,13.801 25.196,13.801 25.313,13.683 25.313,13.201 25.489,13.026 25.588,13.026 26.105,12.508 R14.1@26.105,12.483
BAT: C60.2 C64.1 R23.2 R33.2 R36.1 R51.2 R52.2 | length 108.6
  Top Layer w0.152: R23.2@51.907,9.092 51.943,9.056 v2(51.943,7.925) ; R52.2@72.832,5.469 72.832,5.634 72.045,6.421 72.045,7.489 v2(71.922,7.612) 73.058,7.612 C64.1@73.532,7.138 ; v2(95.25,10.973) 95.25,10.236 R33.2@95.326,10.16
  Top Layer w0.254: C60.2@91.302,5.519 91.465,5.682 v5(91.465,5.994)
  Top Layer w0.5: R23.2@51.907,9.092 52.007,9.092 52.057,9.042 52.057,7.836 v2(52.146,7.747)
  Bottom Layer w0.152: v2(71.922,7.612) 71.922,9.337 74.346,11.76 90.195,11.76 91.389,10.566 91.389,5.918 v5@91.567,5.74 ; v2@72.517,11.523 72.517,11.534 73.737,12.754 94.383,12.754 95.25,11.887 v2(95.25,10.973)
  Bottom Layer w0.5: v2(51.943,7.925) v2@52.07,7.798 ; v2@52.133,7.734 52.133,7.747 v2(52.146,7.747)
  Bottom Layer w1: v2(52.07,8.23) 52.07,7.798 52.07,3.988 58.649,-2.591 88.111,-2.591 88.697,-2.005 88.697,0.092 88.697,0.694 v1@89.623,1.621
  other v1: 89.58,-1.499 90.38,-1.499 91.18,-1.499 91.98,-1.499 92.78,-1.499 93.58,-1.499 94.38,-1.499 95.18,-1.499 95.98,-1.499 89.18,-0.699 89.98,-0.699 90.78,-0.699 91.58,-0.699 92.38,-0.699 93.18,-0.699 93.98,-0.699 94.78,-0.699 95.58,-0.699 96.38,-0.699 89.58,0.101 90.38,0.101 91.18,0.101 91.98,0.101 92.78,0.101 93.58,0.101 94.38,0.101 95.18,0.101 95.98,0.101 89.18,0.901 89.98,0.901 90.78,0.901 91.58,0.901 92.38,0.901 93.18,0.901 93.98,0.901 94.78,0.901 95.58,0.901 96.38,0.901 89.58,1.701 90.38,1.701 91.18,1.701 91.98,1.701 92.78,1.701 93.58,1.701 94.38,1.701 95.18,1.701 95.98,1.701 89.18,2.501 89.98,2.501 90.78,2.501 91.58,2.501 92.38,2.501 93.18,2.501 93.98,2.501 94.78,2.501 95.58,2.501 96.38,2.501 89.58,3.301 90.38,3.301 91.18,3.301 91.98,3.301 92.78,3.301 93.58,3.301 94.38,3.301 95.18,3.301 95.98,3.301 93.98,4.101 94.78,4.101 94.38,4.901 95.18,4.901 93.98,5.701 94.78,5.701 95.58,5.701 96.38,5.701 94.38,6.501 95.18,6.501 95.98,6.501 89.18,7.301 89.98,7.301 90.78,7.301 91.58,7.301 92.38,7.301 93.18,7.301 93.98,7.301 94.78,7.301 95.58,7.301 96.38,7.301 89.58,8.101 90.38,8.101 91.18,8.101 91.98,8.101 92.78,8.101 89.18,8.901 89.98,8.901 90.78,8.901 91.58,8.901 92.38,8.901 89.58,9.701 90.38,9.701 91.18,9.701 91.98,9.701 92.78,9.701
  other v2: 72.507,11.523
  other v5: 96.088,4.597
BTST1: R49.1 U7.26 | length 2.7
  Top Layer w0.152: R49.1@59.903,17.09 59.976,17.018 60.355,17.018 60.718,16.654 U7.26@60.718,14.978
BTST2: R50.1 U7.20 | length 2.8
  Top Layer w0.152: U7.20@63.754,15.062 63.767,15.075 63.767,15.545 64.938,16.716 64.938,16.836 65.237,17.135 R50.1@65.362,17.135
C_CC1: J1.A5 R10.2 U2.4 | length 15.2
  Top Layer w0.2: v2(12.675,13.534) 12.675,13.507 12.572,13.404 12.572,11.501 12.748,11.325 13.009,11.325 R10.2@13.064,11.271 ; v2@12.715,13.524 12.775,13.584 U2.4@13.21,13.584
  Top Layer w0.254: J1.A5@5.969,5.486 6.068,5.486 6.475,5.893 6.542,5.893 v2(6.551,5.902)
  Bottom Layer w0.2: v2(6.551,5.902) 8.382,7.733 8.382,11.218 10.698,13.534 12.628,13.534 v2@12.649,13.513
C_CC2: J1.B5 R11.2 U2.5 | length 19.4
  Top Layer w0.2: R11.2@13.103,11.887 13.136,11.92 13.136,12.347 13.214,12.425 13.214,12.467 13.21,12.471 U2.5@13.21,13.184
  Top Layer w0.254: v2(4.367,2.884) 4.561,2.884 4.623,2.946 4.623,3.036 4.978,3.391 J1.B5@4.978,3.404
  Bottom Layer w0.152: v2(4.367,2.884) 4.38,2.884 4.801,2.464 6.96,2.464 8.859,4.363 8.859,11.162 10.168,12.471 v2(13.233,12.471)
C_SBU1: J1.A8 U2.1 | length 19.9
  Top Layer w0.152: J1.A8@6.789,4.14 6.986,4.338 7.329,4.338 7.64,4.027 v2@7.64,3.901
  Top Layer w0.2: v2(13.056,15.088) 13.056,15.061 13.208,14.908 U2.1@13.208,14.808
  Top Layer w0.254: v2@7.64,3.901 7.659,3.882 v2(7.659,3.87)
  Signal Layer 2 w0.152: v2(7.659,3.87) 7.641,3.888 7.059,3.888 5.436,5.512 5.436,6.325 6.198,7.087 6.198,12.878 8.407,15.088 13.005,15.088 v2@13.056,15.138
C_SBU2: J1.B8 U2.2 | length 20.2
  Top Layer w0.152: v2@3.362,4.174 3.692,4.174 J1.B8@4.115,4.597
  Top Layer w0.2: v2(12.649,14.453) 12.676,14.453 12.745,14.384 U2.2@13.21,14.384
  Top Layer w0.254: v2(3.353,4.166) v2@3.362,4.174
  Bottom Layer w0.152: v2(3.353,4.166) 3.342,4.176 3.342,4.455 3.399,4.512 6.453,6.421 6.51,6.478 6.51,6.541 6.51,14.77 6.555,14.814 6.6,14.859 12.243,14.859 12.601,14.501 v2@12.601,14.481
CC1: C9.1 U1.24 U2.12 | length 13
  Top Layer w0.2: U2.12@16.01,13.584 16.96,13.584 17.448,14.072 v2(17.45,14.072) ; C9.1@21.553,21.337 21.573,21.337 21.886,21.025 21.886,20.821 21.819,20.753 v2(21.819,20.726) 21.838,20.707 21.838,20.529 22.035,20.332 U1.24@22.035,20.157
  Bottom Layer w0.152: v2(17.45,14.072) 17.45,18.821 19.355,20.726 v2(21.819,20.726)
CC2: C8.1 U1.25 U2.11 | length 11.5
  Top Layer w0.2: U2.11@16.01,13.184 17.398,13.184 17.499,13.284 v2(17.526,13.284) ; C8.1@20.879,20.117 20.914,20.082 20.914,20.053 21.335,19.632 U1.25@21.51,19.632
  Bottom Layer w0.152: v2(17.526,13.284) 17.907,13.665 17.907,18.542 19.228,19.863 21.014,19.863 21.031,19.88 v2@21.031,19.888
  other v2: 21.082,19.888
DRV_SUP: C43.1 D3.2 D4.2 R53.2 R55.2 U7.23 | length 20.2
  Top Layer w0.152: R53.2@56.961,20.096 56.964,20.096 57.263,20.395 57.263,20.712 57.623,21.072 59.356,21.072 60.333,20.096 D3.2@61.522,20.096 61.522,19.656 D3.2@61.633,19.546 ; C43.1@61.583,18.288 61.608,18.313 61.608,19.52 D3.2@61.633,19.546 ; D3.2@61.595,20.041 62.889,20.041 D4.2@62.962,20.114 64.152,20.114 65.128,21.09 66.596,21.09 67.788,19.898 67.788,19.148 68.171,18.764 68.171,18.639 68.47,18.341 R55.2@68.595,18.341 ; D3.2@61.633,19.985 D3.2@61.633,19.546 ; U7.23@62.218,14.978 62.237,14.996 62.237,15.704 62.255,15.723
  Top Layer w0.254: C43.1@61.773,17.973 62.255,17.49 62.255,15.735
"E_Fuse Source": J2.4 U1.18 | length 11.2
  Top Layer w0.152: U1.18@24.438,20.345 24.448,20.355 24.448,20.678 25.004,21.234 v2(25.044,21.234)
  Bottom Layer w0.152: J2.4@18.451,26.141 18.451,23.688 19.329,22.809 23.19,22.809 24.765,21.234 v2(25.044,21.234)
EPR_EN: R48.1 U1.7 U2.16 | length 18.7
  Top Layer w0.152: U1.7@24.435,16.205 U1.7@24.459,16.181 ; U1.7@24.435,16.307 U1.7@24.459,16.283 ; U1.7@24.459,16.129 24.459,15.946 24.756,15.649 24.838,15.649 v2(24.867,15.621)
  Signal Layer 2 w0.152: v2(15.469,15.545) 17.424,15.545 18.85,14.119 20.901,14.119 21.565,14.783 24.384,14.783 24.867,15.265 v2(24.867,15.621)
  Bottom Layer w0.152: v2(24.867,15.621) 26.042,15.621 26.321,15.9 28.931,15.9 30.65,17.619 v2(31.155,17.619)
FAN_PWM: J5.2 U8.4 | length 13.8
  Top Layer w0.254: U8.4@16.269,-1.737 18.604,-1.737 19.407,-2.54 23.597,-2.54 24.899,-1.238 28.176,-1.238 28.367,-1.429 28.367,-1.552 28.727,-1.912 J5.2@28.727,-2.057
FAN_TACH: C67.2 J5.4 R111.1 U8.6 | length 17.7
  Top Layer w0.254: U8.6@20.358,-1.087 20.445,-1.174 21.924,-1.174 22.011,-1.087 23.02,-1.087 25.627,1.52 27.193,1.52 27.824,0.889 28.049,0.889 30.367,-1.429 30.367,-1.552 30.593,-1.778 J5.4@30.734,-1.778 ; J5.4@30.71,-2.339 32.48,-2.339 33.63,-1.189 R111.1@33.63,-1.041 ; R111.1@33.655,-1.086 34.868,-1.086 C67.2@34.874,-1.092
FB: C42.2 JP1.2 R52.1 R57.2 U7.12 | length 18.1
  Top Layer w0.152: U7.12@64.868,11.328 64.908,11.288 65.242,11.288 66.466,10.064 66.987,10.064 68.601,8.45 68.651,8.45 69.049,8.849 69.049,8.874 69.269,9.093 C42.2@70.255,9.093 ; v2(70.322,9.085) 70.322,9.237 71.144,10.058 74.197,10.058 76.325,7.931 JP1.2@76.325,7.635
  Bottom Layer w0.152: v2(70.322,9.085) 70.688,8.719 v2(70.688,5.715)
FBG: R57.1 R58.1 R59.1 U7.11 | length 6.6
  Top Layer w0.152: U7.11@64.868,10.828 64.993,10.828 65.042,10.779 65.042,10.409 66.802,8.649 R57.1@66.802,8.382 ; R58.1@67.026,6.904 R57.1@67.026,8.45 ; R58.1@67.079,6.873 67.31,6.642 67.31,5.443 R59.1@67.482,5.272
FSW_SYNC: R62.2 U7.36 | length 2.6
  Top Layer w0.152: R62.2@57.596,8.925 57.621,8.925 58.884,10.187 58.884,10.779 58.9,10.795 U7.36@59.08,10.795
GND: C1.2 C2.2 C3.1 C4.2 C5.2 C6.1 C8.2 C9.2 C10.2 C11.1 C12.2 C13.2 C14.2 C15.2 C16.1 C17.1 C18.2 C19.2 C20.2 C21.2 C22.2 C23.2 C25.2 C26.2 C27.2 C28.2 C31.1 C32.2 C33.2 C34.2 C35.2 C36.2 C37.2 C38.2 C39.2 C43.2 C44.1 C45.2 C46.2 C47.1 C48.1 C49.2 C50.2 C51.1 C52.1 C53.2 C54.2 C55.1 C56.2 C57.2 C59.2 C60.1 C62.2 C64.2 C65.1 C66.1 C67.1 C80.1 J1.A1 J1.A12 J1.B1 J1.B12 J1.S1 J1.S2 J1.S3 J1.S4 J2.5 J3.2 J3.10 J5.3 J6.1 pad.2 pad.4 Q2.1 Q2.4 Q3.4 Q6.1 Q6.2 Q6.3 Q7.1 Q7.2 Q7.3 Q9.4 R15.1 R16.1 R28.1 R29.1 R39.1 R40.1 R47.1 R62.1 R65.1 R71.1 R108.1 U1.11 U1.12 U1.14 U1.19 U1.33 U2.8 U2.13 U2.18 U2.21 U3.1 U3.2 U3.3 U3.4 U3.7 U4.2 U5.10 U6.2 U7.7 U7.17 U7.22 U7.37 U8.5 | length 340.9
  Top Layer w0.152: C57.2@5.796,30.248 5.969,30.421 7.542,30.421 7.623,30.339 v1@14.823,30.339 ; v2(6.121,23.063) 6.612,23.553 6.612,23.76 6.764,23.76 6.787,23.783 6.787,23.91 7.111,24.234 7.136,24.234 7.342,24.028 C59.2@7.418,24.028 ; C59.2@7.238,24.209 C59.2@7.418,24.028 ; C59.2@7.79,24.031 7.422,24.031 C59.2@7.418,24.028 ; 8.871,24.031 10.323,24.031 10.53,23.825 18.675,23.825 20.656,25.806 21.006,25.806 20.991,25.822 20.991,27.544 19.833,28.702 v1@18.823,28.702 ; U2.21@14.58,14.732 14.585,14.732 14.61,14.757 U2.18@14.61,15.384 ; U2.8@14.61,12.584 14.61,13.289 U2.21@14.63,13.31 ; 14.823,30.421 v1@14.823,30.339 ; 18.823,28.821 v1@18.823,28.702 ; C20.2@20.278,7.958 20.361,7.874 C20.2@20.371,7.874 ; C27.2@20.904,6.401 20.904,6.96 20.371,7.493 C20.2@20.371,7.874 ; U1.33@24.054,19.507 24.035,19.526 U1.19@24.035,20.157 24.035,21.901 Q2.1@24.105,21.971 ; Q2.1@24.079,22.052 24.206,22.179 24.206,22.58 24.536,22.911 24.867,22.911 25.245,23.289 25.245,23.728 25.291,23.774 Q2.4@25.324,23.774 ; U4.2@24.286,9.5 23.916,9.129 23.905,9.129 23.713,8.937 23.713,8.927 22.661,7.874 22.261,7.874 22.213,7.826 21.627,7.826 21.579,7.874 C20.2@20.371,7.874 ; U4.2@24.54,9.503 24.29,9.503 23.916,9.877 23.905,9.877 23.713,10.068 23.713,10.837 24.052,11.176 26.543,11.176 26.665,11.054 26.737,11.054 27.076,10.715 C19.2@27.076,10.643 ; U1.33@24.587,18.847 24.602,18.832 U1.14@25.36,18.832 ; U1.33@24.689,17.653 24.71,17.632 U1.11@25.36,17.632 ; U1.33@24.689,18.034 24.691,18.032 U1.12@25.36,18.032 25.384,18.008 25.934,18.008 26.385,17.557 26.385,16.149 25.633,15.397 25.633,14.939 C17.1@25.558,14.864 ; U6.2@25.612,5.344 25.784,5.516 26.475,5.516 27.127,6.168 C28.2@27.127,6.299 ; C12.2@31.852,6.198 31.89,6.236 U3.7@33.541,6.236 37.783,6.236 U3.2@37.795,6.248 ; J3.10@37.182,11.514 37.434,11.262 37.434,8.957 37.475,8.915 U3.4@37.846,8.915 ; U3.1@38.049,5.182 38.049,8.652 U3.4@38.173,8.776 ; C25.2@41.423,4.19 41.423,4.215 41.822,4.613 42.519,4.613 C26.2@42.906,4.227 ; C26.2@42.906,4.252 43.492,4.839 v4(44.425,4.839) ; v2(44.315,11.745) 44.516,11.745 C45.2@45.054,11.207 ; v7(48.425,4.839) v7@48.469,4.795 ; C23.2@48.698,2.184 48.698,2.732 48.813,2.846 v2(48.813,2.886) ; C21.2@49.319,8.968 49.319,8.718 49.793,8.244 49.973,8.244 ; R29.1@49.752,3.623 49.752,4.896 R28.1@49.759,4.902 ; R28.1@49.835,4.978 R28.1@49.759,4.902 ; R47.1@50.013,11.938 50.11,12.035 51.391,12.035 51.391,11.773 C39.2@51.571,11.593 51.751,11.774 51.751,12.035 52.337,12.035 52.36,12.012 52.718,12.012 52.859,11.872 52.859,11.736 C38.2@53.138,11.457 53.193,11.403 53.656,11.403 54.785,10.274 54.785,10.148 54.572,9.935 54.539,9.935 54.324,9.719 54.324,9.691 54.906,9.691 55.091,9.877 55.702,9.877 C44.1@55.982,10.156 ; 50.775,7.263 50.775,5.207 50.47,4.902 R28.1@49.759,4.902 ; v2(54.256,9.691) 55.022,8.925 R62.1@55.996,8.925 ; C32.2@56.621,15.468 C33.2@56.623,16.902 C33.2@56.623,16.902 ; R40.1@60.8,6.807 62.193,6.807 R39.1@62.223,6.777 62.253,6.807 62.636,6.807 v2(62.662,6.782) 63.678,6.782 R71.1@63.754,6.858 ; U7.37@61.968,12.578 62.713,13.322 62.713,14.199 62.718,14.204 62.718,16.002 63.271,16.555 C46.2@63.271,16.612 ; U7.37@62.713,10.947 62.718,10.942 U7.7@62.718,10.178 ; C43.2@63.433,18.288 C43.2@63.433,18.22 ; v2(63.5,18.161) 63.441,18.22 C43.2@63.433,18.22 ; v2(63.551,17.12) 63.54,17.12 63.5,17.16 63.465,17.16 63.4,17.225 63.4,18.128 63.433,18.161 C43.2@63.433,18.22 ; R71.1@64.059,6.833 65.394,6.833 R65.1@65.399,6.827 ; U7.17@64.868,13.828 68.006,13.828 v2@68.351,14.173 ; C34.2@68.137,12.454 C34.2@68.163,12.454 ; C35.2@68.157,11.106 68.214,11.163 68.214,12.454 C34.2@68.163,12.454 ; C34.2@68.378,12.668 C34.2@68.163,12.454 ; v1@14.823,30.339 16.65,30.339 C55.1@16.675,30.365 16.371,30.06 16.371,29.949 17.498,28.822 17.498,28.702 v1@18.823,28.702
  Top Layer w0.2: C31.1@2.349,23.039 2.654,23.039 2.658,23.042 5.135,23.042 C56.2@5.138,23.046 ; v2(6.121,23.063) 6.139,23.046 6.768,23.046 7.033,22.781 7.033,21.924 7.298,21.659 7.436,21.659 7.729,21.365 7.729,21.434 7.742,21.446 7.742,22.038 C3.1@7.762,22.059 7.992,21.829 7.992,20.782 C5.2@7.834,20.625 8.109,20.35 8.109,19.756 C4.2@7.809,19.456 ; 8.577,24.031 8.871,24.031 8.871,23.91 9.489,23.292 10.475,23.292 11.081,22.686 11.081,22.561 11.381,22.261 C80.1@11.506,22.261 11.506,22.225 v2(11.481,22.2) ; U2.8@14.61,12.584 14.61,11.801 14.633,11.777 14.633,11.683 14.833,11.483 C10.2@14.933,11.483 ; C1.2@15.283,16.678 15.309,16.703 16.719,16.703 17.227,16.195 17.932,16.195 C13.2@18.116,16.379 ; U2.21@15.316,13.995 15.328,13.984 U2.13@16.01,13.984 ; C15.2@18.587,18.877 C15.2@18.618,18.846 ; C8.2@20.854,20.711 20.914,20.771 20.914,21.277 20.974,21.337 C9.2@20.993,21.337 ; v2(25.832,13.995) 26.187,13.995 v2(26.213,14.021)
  Top Layer w0.254: J1.S1@2.931,7.542 J1.S1@3.023,7.449 ; J1.B12@3.27,6.433 3.197,6.433 1.499,4.734 1.499,2.718 3.302,0.914 4.902,0.914 4.953,0.864 5.236,0.864 5.516,1.143 6.618,1.143 7.003,0.758 7.007,0.758 J1.S2@7.087,0.838 ; J1.B12@3.276,6.426 3.331,6.48 3.331,6.613 3.185,6.759 3.185,7.287 J1.S1@3.023,7.449 ; J1.S1@3.313,8.266 v1@3.313,10.172 ; v1(3.473,10.299) 3.439,10.299 v1@3.313,10.172 ; v1(3.6,11.772) 3.313,11.772 ; J1.A1@4.648,7.061 4.261,7.449 J1.S1@3.023,7.449 ; J1.B1@6.147,1.778 6.278,1.778 7.165,0.892 J1.S2@7.165,0.766 ; J1.A12@7.62,2.413 7.602,2.395 7.602,2.197 7.781,2.018 7.781,0.873 J1.S2@7.846,0.808 ; C59.2@7.79,24.031 8.577,24.031 8.784,23.825 ; C4.2@7.809,19.456 7.809,19.431 5.218,16.84 4.702,16.84 4.481,16.619 4.021,16.619 3.959,16.557 3.928,16.557 3.313,15.941 3.313,11.772 ; C18.2@20.333,14.418 20.397,14.482 20.932,14.482 20.995,14.545 C16.1@20.995,14.578 20.995,14.693 21.149,14.847 21.149,14.977 v2(21.158,14.986) ; R15.1@23.156,11.96 23.369,12.173 v2(23.369,12.475) ; C17.1@25.558,14.864 25.622,14.8 25.622,14.267 25.85,14.039 25.875,14.039 25.893,14.021 v2(26.213,14.021) ; J5.3@29.71,-2.339 29.71,-2.294 v1(29.718,-2.286) ; C48.1@32.268,32.279 32.78,32.791 v5(33.553,32.791) ; C60.1@81.712,6.392 82.585,5.519 C60.1@83.302,5.519 ; v1@3.313,10.172 3.313,10.299 3.313,11.772
  Top Layer w0.5: C15.2@18.567,18.877 18.537,18.877 18.537,17.904 18.211,17.579 C14.2@18.211,17.554 18.164,17.506 18.164,16.427 C13.2@18.116,16.379 18.182,16.313 18.182,11.104 18.821,10.465 18.821,9.249 20.113,7.958 C20.2@20.278,7.958
  Signal Layer 1 w0.152: 42.875,26.746 42.85,26.721 42.85,25.382 48.547,19.685 54.839,19.685 ; 61.824,17.12 v2(63.551,17.12)
  Signal Layer 1 w0.5: 54.839,19.736 58.141,19.736 59.715,18.161 v2(63.5,18.161) 72.009,18.161 73.66,19.812 ; v2(63.551,17.12) 63.856,17.424 71.222,17.424